# Altium PCB PCB1.PcbDoc (part 1 of 3)
Units mil, origin at the board's own origin, x right, y up, seen from the top; angles counter-clockwise.
Board outline 4825 x 2725 mil, 2 copper layers (Top Layer, Bottom Layer); 148 components, 112 nets, 484 pads, 116 vias.
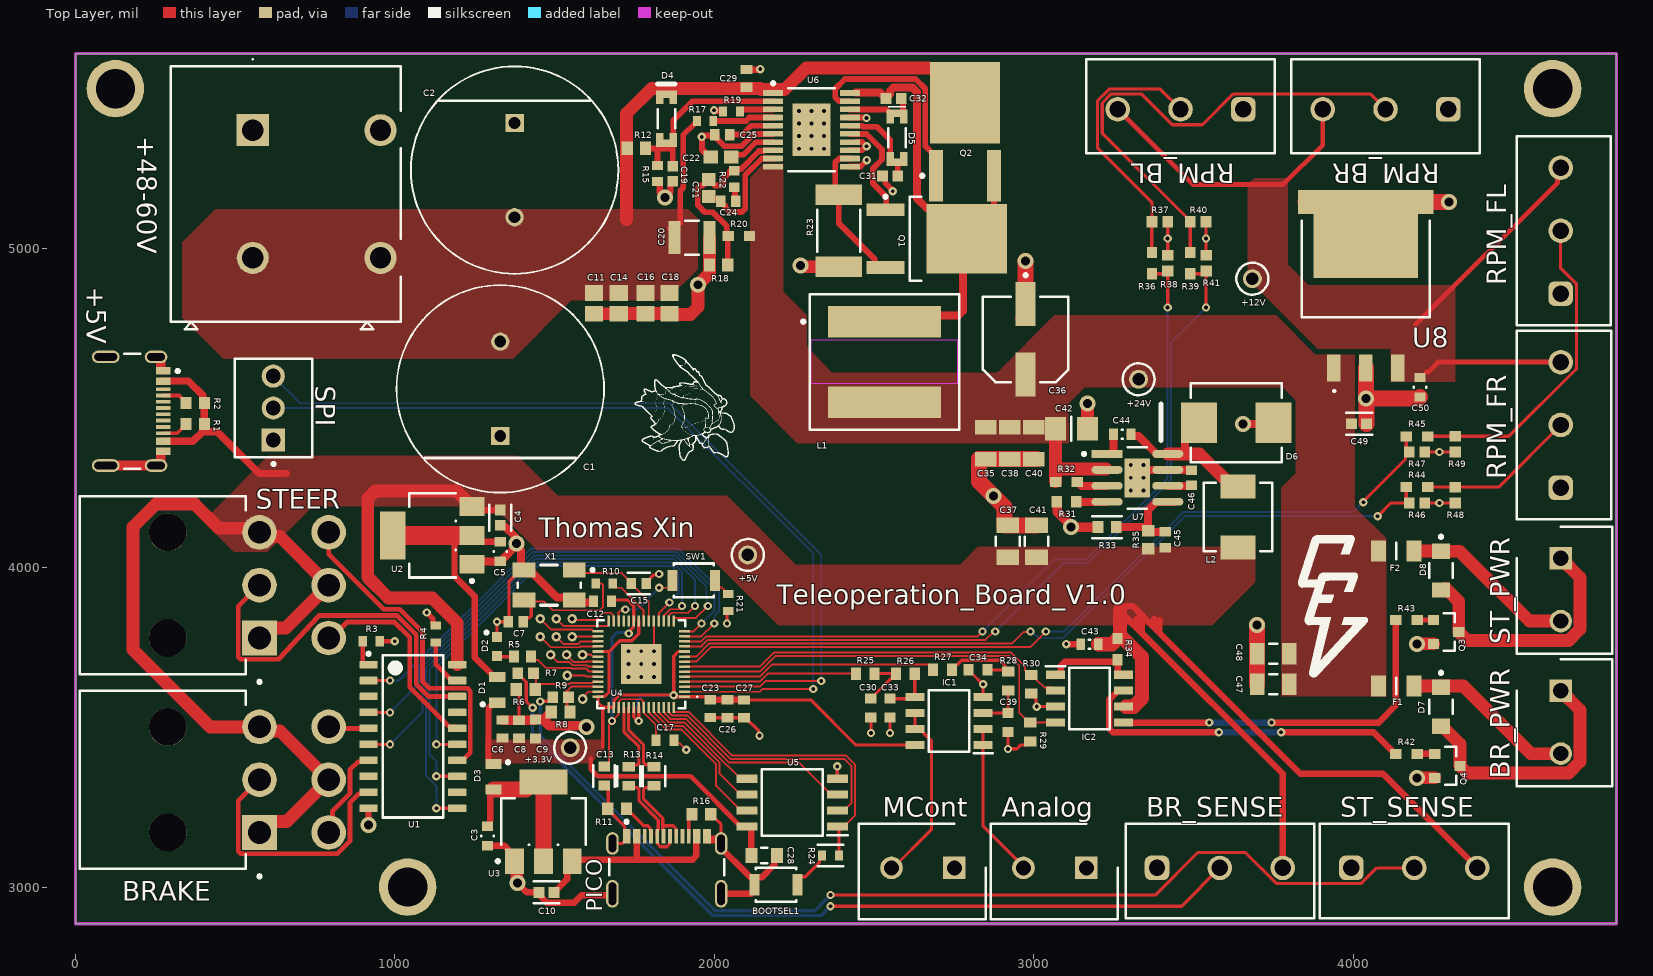
[diagram p0: Top Layer view]
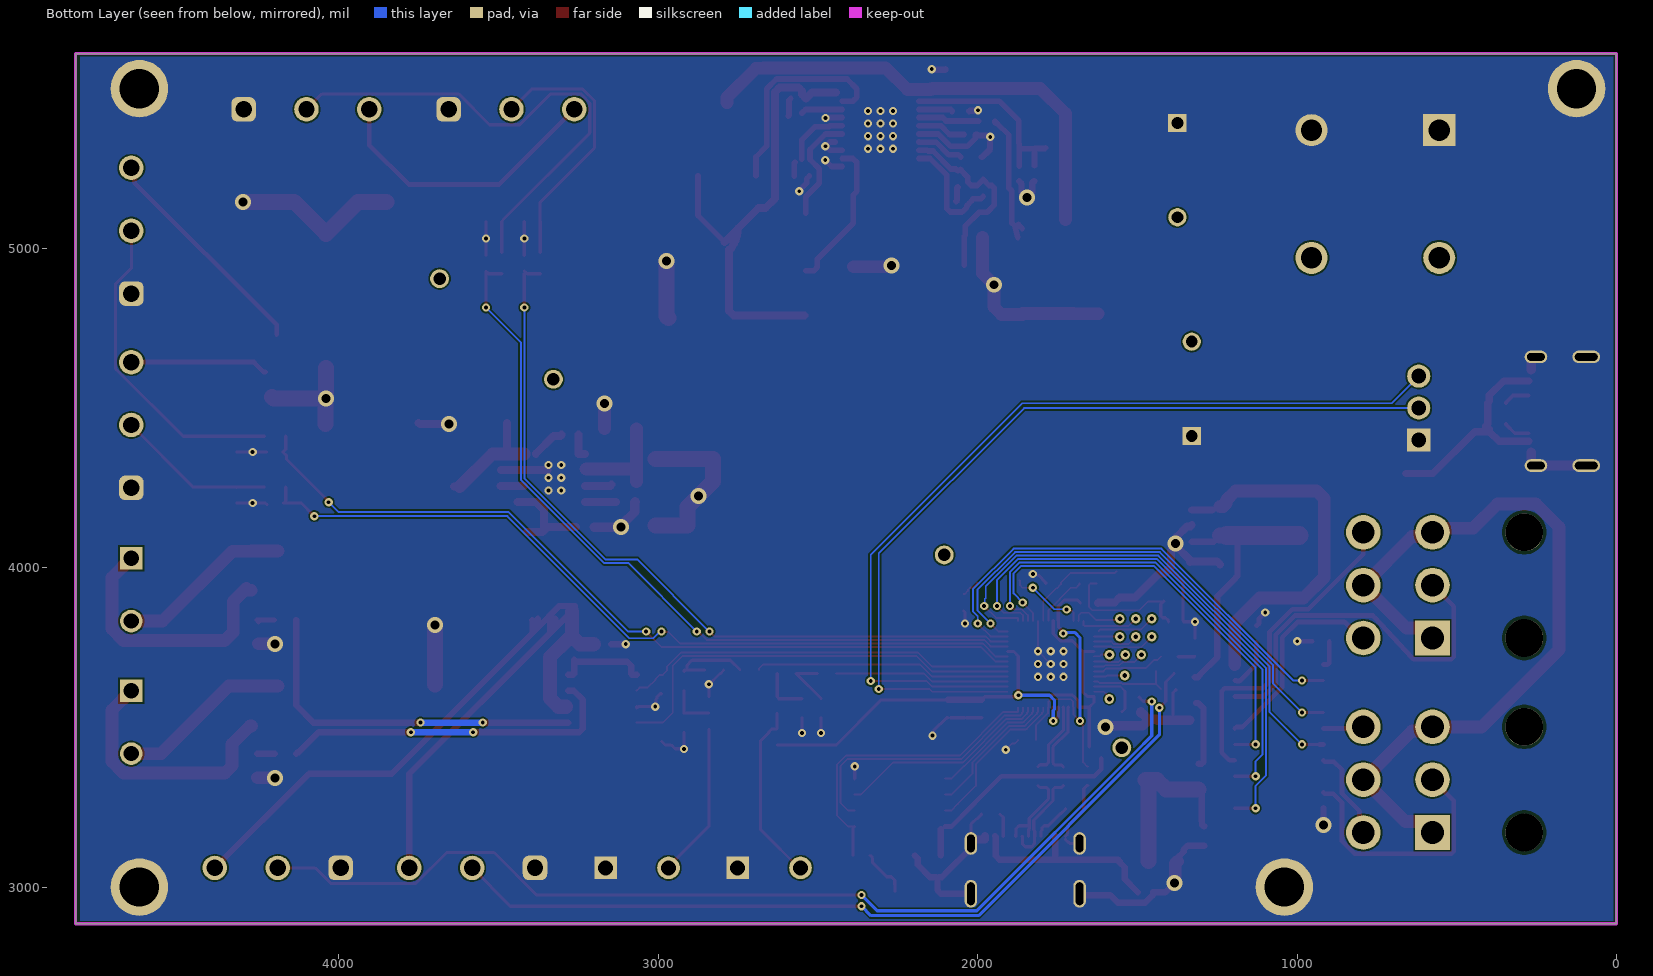
[diagram p1: Bottom Layer view, seen from below]
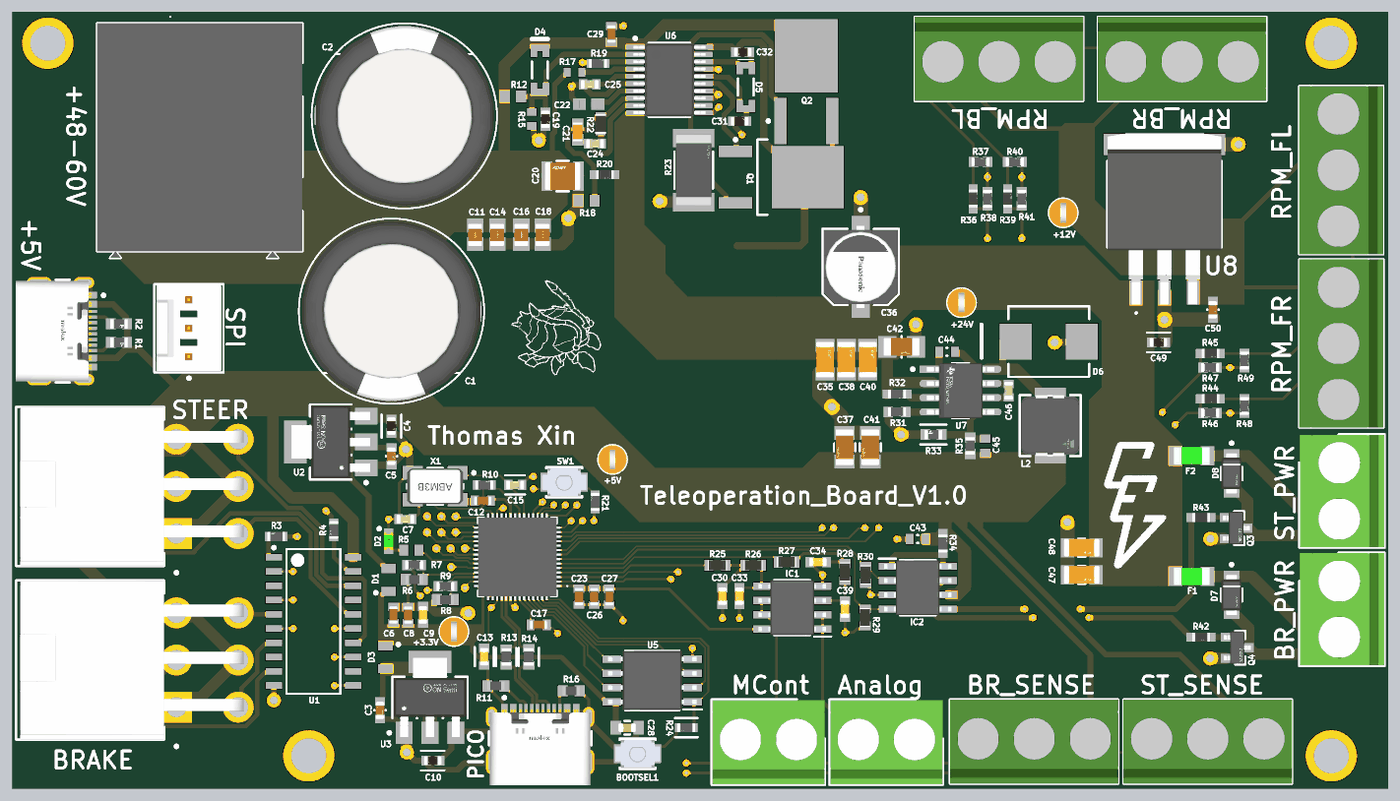
[diagram p3: 3D render of the assembled board from above, using the file's embedded part models]

## Layer stack, top to bottom
Top Solder: solder mask 0.4, Solder Resist, Dk 3.5
Top Layer: signal copper 1.4
Dielectric 1: dielectric 12.6, FR-4, Dk 4.8
Bottom Layer: signal copper 1.4
Bottom Solder: solder mask 0.4, Solder Resist, Dk 3.5

## Board outline
0,2885 4825,2885 4825,5610 0,5610

## Design rules (kind name [scope] priority, off if disabled: settings)
BoardOutlineClearance [All] p1: gap=7.87 ignorepadtopadclearanceinfootprint=FALSE
Clearance [All] p1: gap=5 ignorepadtopadclearanceinfootprint=FALSE except(4: Arc-Arc Arc-Track Track-Track; 9.84: Arc-Hole Track-Hole SMDPad-Hole THPad-Hole Via-Hole Fill-Hole Poly-Hole Region-Hole Text-Hole)
ComponentClearance [All] p1: gap=5 collisioncheckmode=3 verticalgap=5 showdistances=TRUE
DiffPairsRouting [All] p1: maxlimit=4 minlimit=4 mostfreqgap=4 toplayer_minwidth=7 toplayer_maxwidth=11 toplayer_prefwidth=11 bottomlayer_minwidth=7 bottomlayer_maxwidth=11 bottomlayer_prefwidth=11 maxuncoupledlength=500
Height [All] p1: minheight=0 maxheight=71497.94 prefheight=500
HoleSize [All] p1: absolutevalues=TRUE maxlimit=248.03 minlimit=11.81 maxpercent=80.000 minpercent=20.000
HoleToHoleClearance [All] p1: gap=9.84 allowstackedmicrovias=FALSE
MinimumAnnularRing [All] p1: minimumring=3
MinimumSolderMaskSliver [All] p1: minsoldermaskwidth=0
PlaneClearance [All] p1: clearance=5
PlaneConnect PlaneConnectPowerPads [InPadClass('PowerPads')] p1: planeconnectstyle=Direct reliefexpansion=20 reliefentries=4 reliefconductorwidth=10 reliefairgap=10
PlaneConnect [All] p2: planeconnectstyle=Direct reliefexpansion=11.81 reliefentries=4 reliefconductorwidth=5 reliefairgap=5
PolygonConnect PolygonConnectPowerPads [All vs (InPadClass('PowerPads'))] p1: connectstyle=Direct reliefconductorwidth=10 reliefentries=4 polygonreliefangle="90 Angle" airgapwidth=10
PolygonConnect [All] p2: connectstyle=Direct reliefconductorwidth=5 reliefentries=4 polygonreliefangle="90 Angle" airgapwidth=5
RoutingVias [All] p1: holewidth=11.81 width=23.62 viastyle="Through Hole" minholewidth=11.81 minwidth=23.62 maxholewidth=23.62 maxwidth=259.84
SilkToSilkClearance [All] p1: silktosilkclearance=0
SilkToSolderMaskClearance [IsPad] p1: minsilkscreentomaskgap=5 clearancetoexposedcopper=TRUE
SolderMaskExpansion [All] p1: expansion=2.95 istentingtop=FALSE
SupplyNets "Schematic Supply Nets_7" [InNet('+3V3')] p1: voltage=0.000
SupplyNets "Schematic Supply Nets_6" [InNet('+12')] p2: voltage=0.000
SupplyNets "Schematic Supply Nets_5" [InNet('+1V1')] p3: voltage=0.000
SupplyNets "Schematic Supply Nets_4" [InNet('+48')] p4: voltage=0.000
SupplyNets "Schematic Supply Nets_3" [InNet('GND')] p5: voltage=0.000
SupplyNets "Schematic Supply Nets_2" [InNet('+24')] p6: voltage=0.000
SupplyNets "Schematic Supply Nets_1" [InNet('VCC')] p7: voltage=0.000
SupplyNets "Schematic Supply Nets" [InNet('+5')] p8: voltage=0.000
Width [All] p1: maxlimit=1000 minlimit=5 preferedwidth=5 minimp=50.000000 maximp=50.000000 favimp=50.000000
20 further rules are at their usual default settings.

## Classes and differential pairs
component class "voltage dividers": R3 R25 R38 R39 R41 R43 R44 R46 R48
component class U_Sheet1: bootsel BOOTSEL1 C3 C7 C8 C10 C11 C13 C16 C26 C29 C35 C37 C40 C41 D2 D6 PICO R10 R11 R13 R19 R20 R21 R25 SW1 U3 U4 X1
component class Teleoperation_Board_V1.0: +5V +48-60V Analog BR_PWR BR_SENSE BRAKE C2 MCont R1 R2 R26 R31 R48 R49 RPM_BL rpm_br RPM_FL RPM_FR spI ST_PWR ST_SENSE STEER
component class "steppers and drivetrain": C8 C13 C26 C30 IC2 R3 R13 R25 R26 R28 R46 U1
component class power: +3.3v +5V +12V +24V C7 C8 C11 C14 C16 C18 C19 C25 C26 C29 C30 C31 C32 C35 C37 C40 C41 C42 C45 C46 C50 D1 D2 D6 L2 Q1 R1 R12 R18 R19 R20 R31 R32 R35 R39 U1 U2 U6 U8
component class Designator: C46 D7 D8 F1 IC2 Q3 Q4 R10 R11 R30 R34 R43
differential pair NewDifferentialPair1: +USB_P -USB_N
differential pair PICO_USB: +NetR26_1 -NetR27_1

## Components (designator, comment, footprint, x,y, rotation, side; value= is the part's Value field where it differs from the comment)
+3.3V "5003" KSTN-5003 1548.76,3436.29 r90 top (schematic designator TP_4)
+5V "5003" KSTN-5003 2105,4040 r90 top (schematic designator TP_2)
+5V "217179-0001" FP-2171790001-MFG 140,4490 r270 top (schematic designator J7)
+12V "5003" KSTN-5003 3685,4905 r90 top (schematic designator TP_3)
+24V "5003" KSTN-5003 3328.55,4590 r90 top (schematic designator TP_1)
+48-60V "VP0265540000G" VP0265540000G 555,5370 r270 top (schematic designator P1)
Analog "691137710002" SHDR2W70P0X500_1X2_1000X750X1150P 3165,3060 r180 top (schematic designator J15)
BOOTSEL1 "B3U-1000P" FP-B3U-1000P-MFG 2193.03,3007.43 r0 top (schematic designator SW1)
BR_PWR "691137710002" SHDR2W70P0X500_1X2_1000X750X1150P 4650.41,3614.59 r270 top (schematic designator J14)
BR_SENSE "691137710003" 691137710003 3583.15,3050.16 r0 top (schematic designator J1)
BRAKE "39-30-0060" FP-39-30-0060-MFG 280.82,3336.24 r270 top (schematic designator J10)
C1 "ESH477M100AM2AA" FP-ESH477M100AM2AA-MFG 1330,4560 r90 top (schematic designator C2)
C2 "ESH477M100AM2AA" FP-ESH477M100AM2AA-MFG 1375,5245 r270 top (schematic designator C1)
C3 "GRT188R61E106ME13D" FP-GRT188-0_2-MFG 1290,3160 r270 top (schematic designator C30)
C4 "UMK107AB7105KA-T" FP-0603-L_1_6_0_15-W_0_8-IPC_C 1329.92,4156.76 r270 top (schematic designator C27)
C5 "GRT188R61E106ME13D" FP-GRT188-0_2-MFG 1330,4051.08 r270 top (schematic designator C26)
C6 "CL10B104KC8NNNC" CAPC1608X90N 1336.91,3494.68 r90 top value=100nF (schematic designator C37)
C7 "C0603C270J5GACTU" FP-C0603C-CF-MFG 1378.87,3830.55 r0 top value="27 pF" (schematic designator C49)
C8 "CL10B104KC8NNNC" CAPC1608X90N 1388.49,3494.19 r90 top value=100nF (schematic designator C36)
C9 "CC0603KPX7R7BB105" FP-CC0603-DA-MFG 1440.54,3494.71 r90 top value="1 uF" (schematic designator C35)
C10 "UMK107AB7105KA-T" FP-0603-L_1_6_0_15-W_0_8-IPC_C 1474.79,2983.48 r180 top (schematic designator C31)
C11 "2.2uF" FP-GRM21B-0_2-e0_2_0_7-IPC_B 1623.22,4827.81 r270 top (schematic designator C4)
C12 "CL10B104KC8NNNC" CAPC1608X90N 1650,3895 r180 top value=100nF (schematic designator C33)
C13 "CC0603KPX7R7BB105" FP-CC0603-DA-MFG 1655.27,3348.01 r270 top value="1 uF" (schematic designator C34)
C14 "2.2uF" FP-GRM21B-0_2-e0_2_0_7-IPC_B 1700.88,4827.81 r270 top (schematic designator C5)
C15 "C0603C270J5GACTU" FP-C0603C-CF-MFG 1763.51,3950.44 r180 top value="27 pF" (schematic designator C48)
C16 "2.2uF" FP-GRM21B-0_2-e0_2_0_7-IPC_B 1785,4827.81 r270 top (schematic designator C6)
C17 "CL10B104KC8NNNC" CAPC1608X90N 1845.8,3460 r0 top value=100nF (schematic designator C32)
C18 "2.2uF" FP-GRM21B-0_2-e0_2_0_7-IPC_B 1860,4827.81 r270 top (schematic designator C7)
C19 "UMK107AB7105KA-T" FP-0603-L_1_6_0_15-W_0_8-IPC_C 1869.86,5233.53 r270 top
C20 "C1210C105K1RACTU" FP-C1210C105K1RACTU-MFG 1930.1,5033.77 r0 top (schematic designator C8)
C21 "CC0603JRNPO9BN101" CAPC1608X90X40ML10T20 1982.8,5188.62 r270 top (schematic designator C20)
C22 "CL10B104KC8NNNC" FP-CL10-IPC_A 2020.97,5285.81 r0 top (schematic designator C10)
C23 "CL10B104KC8NNNC" CAPC1608X90N 1987.45,3558.42 r270 top value=100nF (schematic designator C40)
C24 "C0603C332J5RACTU" FP-C0603C-CF-MFG 2043.52,5147.74 r0 top value="3,300 pF" (schematic designator C18)
C25 "1000 pF" FP-C0603C-CF-MFG 2025.02,5355.65 r0 top value="1,000 pF" (schematic designator C11)
C26 "CL10B104KC8NNNC" CAPC1608X90N 2041.01,3558.35 r270 top value=100nF (schematic designator C39)
C27 "CL10B104KC8NNNC" CAPC1608X90N 2093.51,3558.23 r270 top value=100nF (schematic designator C38)
C28 "CL10B104KC8NNNC" FP-CGA3E-0_3-0_1-IPC_A 2156.55,3098.79 r0 top (schematic designator C41)
C29 "CL10B104KC8NNNC" CAPC1608X90N 2100.99,5532.19 r90 top value=100nF (schematic designator C9)
C30 "22nF" FP-CC0603-DA-MFG 2490.47,3560.39 r270 top value="22 nF" (schematic designator C44)
C31 "UMK107AB7105KA-T" FP-0603-L_1_6_0_15-W_0_8-IPC_C 2550.93,5226.23 r0 top (schematic designator C21)
C32 "UMK107AB7105KA-T" FP-0603-L_1_6_0_15-W_0_8-IPC_C 2561.52,5468.99 r180 top (schematic designator C3)
C33 "22nF" FP-CC0603-DA-MFG 2550,3560.39 r270 top value="22 nF" (schematic designator C45)
C34 "22nF" FP-CC0603-DA-MFG 2825.47,3680 r180 top value="22 nF" (schematic designator C46)
C35 "885012108022" FP-CL31-IPC_C 2850,4390 r270 top value=10uF (schematic designator C17)
C36 "50SVPK10M" FP-OS-CON-SMT-C6-MFG 2975,4715 r270 top (schematic designator C12)
C37 "47uF" FP-GRM31C-0_3-e0_3_0_8-IPC_C 2918.85,4082.59 r270 top (schematic designator C28)
C38 "885012108022" FP-CL31-IPC_C 2925,4390 r270 top value=10uF (schematic designator C16)
C39 "22nF" FP-CC0603-DA-MFG 2920,3515 r270 top value="22 nF" (schematic designator C47)
C40 "885012108022" FP-CL31-IPC_C 3000,4390 r270 top value=10uF (schematic designator C15)
C41 "47uF" FP-GRM31C-0_3-e0_3_0_8-IPC_C 3008.85,4082.59 r270 top (schematic designator C23)
C42 "4.7uF" FP-GRJ31C-0_3-IPC_B 3118.42,4435.14 r0 top
C43 "CAP 100nF 10V 0603(1608)" CAPC0603(1608)100_L 3175,3760.75 r0 top value=100nF (schematic designator C50)
C44 "100nF" CAPC0603(1608)100_L 3277.27,4417.42 r0 top (schematic designator C22)
C45 "220pF" CAPC1608X92X38LL15T08 3412.06,4087.69 r270 top (schematic designator C29)
C46 "15nF" FP-C0603C-CF-MFG 3494.03,4281.34 r90 top value="15,000 pF" (schematic designator C43)
C47 "885012108022" FP-CL31-IPC_C 3750,3635 r180 top value=10uF (schematic designator C14)
C48 "885012108022" FP-CL31-IPC_C 3750,3730 r180 top value=10uF (schematic designator C13)
C49 "UMK107AB7105KA-T" FP-0603-L_1_6_0_15-W_0_8-IPC_C 4018.94,4450.59 r0 top (schematic designator C25)
C50 "GRT188R61E106ME13D" FP-GRT188-0_2-MFG 4210,4565 r270 top (schematic designator C24)
D1 "BAT42WS RRG" "BAT42WS RRG-Footprint-1" 1320,3617.12 r90 top (schematic designator D5)
D2 "LTST-C190GKT" FP-LTST-C190GKT-MFG 1320,3752.83 r270 top (schematic designator D4)
D3 "BAT42WS RRG" "BAT42WS RRG-Footprint-1" 1308.85,3345.85 r270 top (schematic designator D7)
D4 "LL4148" FAIR-SOD80-2_V 1850.24,5406.22 r90 top (schematic designator D2)
D5 "LL4148" FAIR-SOD80-2_V 2572.01,5346.33 r90 top (schematic designator D1)
D6 "700mV" DIOD-B5X0C-2_M 3634.42,4453.59 r0 top (schematic designator D3)
D7 "NRVBSS34FA" FP-425AB-MFG 4275.41,3564.59 r270 top (schematic designator D12)
D8 "NRVBSS34FA" FP-425AB-MFG 4275.41,3990.61 r270 top (schematic designator D11)
F1 "046802.5NR" FUSC3215X76N 4135.41,3629.59 r0 top (schematic designator F2)
F2 "046802.5NR" FUSC3215X76N 4135.41,4052.54 r0 top (schematic designator F1)
IC1 "TLV9002IDR" SOIC127P600X175-8N 2735,3520 r180 top (schematic designator IC2)
IC2 "UCC27624DR" SOIC127P600X175-8N 3175,3590 r0 top (schematic designator IC1)
L1 "78439369150" WE-XHMA_1090 52532.7,54644.29 r0 top
L2 "4.7 uH" FP-IHLP-2020CZ-FP_1_905x2-MFG 3639.42,4158.59 r270 top
MCont "691137710002" SHDR2W70P0X500_1X2_1000X750X1150P 2751.85,3060 r180 top (schematic designator J12)
PICO "217179-0001" FP-2171790001-MFG 1851.33,3024.35 r0 top (schematic designator J11)
Q1 "DMT10H009LK3-13" DPAK229P991X239-3N 2697.48,5030 r0 top (schematic designator Q2)
Q2 "RD3P100SNTL1" DPAK230P990X240-3N 2785,5365 r90 top (schematic designator Q1)
Q3 "DMN6140L-13" FP-SOT23-MFG 4291.57,3798.96 r0 top
Q4 "DMN6140L-13" FP-SOT23-MFG 4295.41,3379.59 r0 top
R1 "10kOhm" FP-MCT0603-IPC_B 374.89,4450.47 r0 top (schematic designator R22)
R2 "10kOhm" FP-MCT0603-IPC_B 374.89,4515.43 r0 top (schematic designator R21)
R3 "AA0603JR-070RL" FP-AF0603-IPC_C 926.11,3769.55 r180 top (schematic designator R47)
R4 "AA0603JR-070RL" FP-AF0603-IPC_C 1127.86,3792.43 r270 top (schematic designator R44)
R5 "ERJ-3EKF1150V" RESC1608X55X30NL15T15 1399.76,3721.48 r180 top (schematic designator R28)
R6 "MCT06030D5001BP500" RESC1608X55N 1409.69,3618.72 r180 top (schematic designator R35)
R7 "ERA3AEB202V" FP-ERA3A-IPC_C 1409.69,3669.63 r180 top (schematic designator R33)
R8 "MCT06030D5001BP500" RESC1608X55N 1518.96,3548.14 r180 top (schematic designator R34)
R9 "ERA3AEB202V" FP-ERA3A-IPC_C 1518.96,3594.88 r180 top (schematic designator R32)
R10 "RC0603FR-071KL" FP-RC0603-0_55-IPC_C 1655.16,3950.22 r0 top (schematic designator R42)
R11 "ERJ-3EKF5101V" RESC1608X55N 1695.82,3245.46 r180 top value=5.1k (schematic designator R24)
R12 "ERJ-3EKF6192V" RESC1608X55X30ML15T15 1755.91,5313.14 r180 top (schematic designator R15)
R13 "CRCW060327R4FKEA" FP-CRCW0603-e3-MFG 1732.12,3346.89 r270 top (schematic designator R27)
R14 "CRCW060327R4FKEA" FP-CRCW0603-e3-MFG 1811.25,3347.39 r270 top (schematic designator R26)
R15 "ERJ-3EKF3921V" RESC1608X55X30LL15T15#1 1822.26,5234.28 r90 top (schematic designator R17)
R16 "ERJ-3EKF5101V" RESC1608X55N 1959.79,3228.23 r0 top value=5.1k (schematic designator R25)
R17 "RC0603FR-071ML" RESC1608X55X25LL10T15 1971.61,5397.98 r0 top (schematic designator R13)
R18 "ERJ-3EKF1431V" RESC1608X55X30ML15T15 2013.7,4948.03 r0 top
R19 "RC0603FR-0712K4L" FP-RC0603-0_55-IPC_C 2053.78,5428.69 r0 top value=12.4kΩ (schematic designator R14)
R20 "RT0603BRE0726K7L" FP-RT0603-MFG 2077.06,5038.85 r0 top value=26.7KΩ (schematic designator R16)
R21 "RC0603FR-071KL" FP-RC0603-0_55-IPC_C 2044,3890.75 r90 top (schematic designator R30)
R22 "ERJ3EKF1802V" RESC1608X55X30LL15T15#2 2062.75,5217.36 r270 top (schematic designator R20)
R23 "PA2512FKE7W0R007E" FP-PA2512E-R007-0R10-MFG 2389.69,5055 r90 top value=7mΩ (schematic designator R19)
R24 "RC0603FR-071KL" FP-RC0603-0_55-IPC_C 2363.7,3099.18 r180 top (schematic designator R29)
R25 "Resistor 10k +/-1% 0603 100 mW" RESC1608X55X25ML10T15 2472.76,3668.5 r0 top value=10k (schematic designator R36)
R26 "Resistor 10k +/-1% 0603 100 mW" RESC1608X55X25ML10T15 2598.21,3668.5 r0 top value=10k (schematic designator R37)
R27 "Resistor 10k +/-1% 0603 100 mW" RESC1608X55X25ML10T15 2715,3680 r0 top value=10k (schematic designator R38)
R28 "Resistor 10k +/-1% 0603 100 mW" RESC1608X55X25ML10T15 2920,3645 r270 top value=10k (schematic designator R39)
R29 "Resistor 10k +/-1% 0603 100 mW" RESC1608X55X25ML10T15 2990,3485.47 r90 top value=10kohm (schematic designator R43)
R30 "Resistor 10k +/-1% 0603 100 mW" RESC1608X55X25ML10T15 2991.97,3635 r90 top value=10kohm (schematic designator R46)
R31 "26.7 kOhm" FP-AC0603-IPC_B 3102.67,4206.34 r0 top (schematic designator R40)
R32 "100 kOhm" FP-AC0603-MFG 3102.67,4268.59 r0 top (schematic designator R23)
R33 "10kOhm" FP-MCT0603-IPC_B 3229.87,4127.06 r180 top (schematic designator R41)
R34 "100 kOhm" FP-AC0603-MFG 3263.27,3745 r90 top (schematic designator R48)
R35 "68.1kOhm" FP-CRCW0603-e3-IPC_B 3358.73,4087.65 r90 top (schematic designator R31)
R36 "RT0603BRD075K23L" FP-RT0603-MFG 3370,4953.66 r90 top value=5.23KΩ (schematic designator R5)
R37 "ERA-3AEB103V" FP-ERA3A-IPC_C 3395,5083.66 r0 top (schematic designator R11)
R38 "ERA3AEB202V" FP-ERA3A-IPC_C 3419.63,4953.66 r270 top (schematic designator R6)
R39 "RT0603BRD075K23L" FP-RT0603-MFG 3490.37,4953.66 r90 top value=5.23KΩ (schematic designator R7)
R40 "ERA-3AEB103V" FP-ERA3A-IPC_C 3515.37,5083.66 r0 top (schematic designator R12)
R41 "ERA3AEB202V" FP-ERA3A-IPC_C 3540,4953.66 r270 top (schematic designator R8)
R42 "47ohm" FP-RT0603-MFG 4167.5,3416.99 r0 top value=47Ω (schematic designator R49)
R43 "47ohm" FP-RT0603-MFG 4167.5,3836.36 r0 top value=47Ω (schematic designator R45)
R44 "RT0603BRD075K23L" FP-RT0603-MFG 4200.37,4252.53 r0 top value=5.23KΩ (schematic designator R2)
R45 "RT0603BRD075K23L" FP-RT0603-MFG 4200.37,4411.49 r0 top value=5.23KΩ (schematic designator R1)
R46 "ERA3AEB202V" FP-ERA3A-IPC_C 4200.37,4202.53 r180 top (schematic designator R4)
R47 "ERA3AEB202V" FP-ERA3A-IPC_C 4200.37,4362.22 r180 top (schematic designator R3)
R48 "ERA-3AEB103V" FP-ERA3A-IPC_C 4320.37,4227.16 r270 top (schematic designator R9)
R49 "ERA-3AEB103V" FP-ERA3A-IPC_C 4320.37,4386.86 r270 top (schematic designator R10)
RPM_BL "691137710003" 691137710003 3460,5444.84 r180 top (schematic designator J5)
RPM_BR "691137710003" 691137710003 4101.85,5444.84 r180 top (schematic designator J6)
RPM_FL "691137710003" 691137710003 4659.84,5055 r90 top (schematic designator J4)
RPM_FR "691137710003" 691137710003 4660.25,4446.85 r90 top (schematic designator J3)
SPI "22-29-2031" FP-22-29-2031-MFG 620,4500 r90 top (schematic designator J8)
ST_PWR "691137710002" SHDR2W70P0X500_1X2_1000X750X1150P 4650.41,4029.59 r270 top (schematic designator J13)
ST_SENSE "691137710003" 691137710003 4191.85,3050.16 r0 top (schematic designator J2)
STEER "39-30-0060" FP-39-30-0060-MFG 280.82,3945.25 r270 top (schematic designator J9)
SW1 "B3U-1000P" FP-B3U-1000P-MFG 1935.61,3960 r0 top (schematic designator SW2)
U1 "SN74AHCT244NSR" NS0020A_L 1056.35,3471.81 r0 top (schematic designator U7)
U2 "TLV76136DCYR" TLV76136DCYR-Footprint-1 1117.16,4101.19 r180 top (schematic designator U3)
U3 "TLV76136DCYR" TLV76136DCYR-Footprint-1 1465,3205 r90 top (schematic designator U4)
U4 "RP2040" RP2040TR7 1771.39,3698.25 r180 top (schematic designator U5)
U5 "AT25QF128A-SHB-T" SOIC127P790X216-8N 2244.5,3264.4 r180 top (schematic designator U6)
U6 "LM5116MHX/NOPB" PWP0020A_M 2304.54,5371.01 r0 top (schematic designator U1)
U7 "LMR16030SDDAR" FP-DDA0008E-IPC_A 3324.99,4281.34 r0 top (schematic designator U8)
U8 "LM7812S_NOPB" KTT0003B 4040,5123.82 r270 top (schematic designator U2)
X1 "ABM3B-12.000MHZ-B2-T" ABRA-ABM3B-4_V 1483.04,3945.69 r180 top

## Footprints (in the part's own frame and the unit in brackets; to place one, negate y for a bottom-side part, rotate by r counter-clockwise, add the part's x,y. Pads: shape width x height; smd on the part's side, far side on the other; paste and mask are expansions set on the pad)
691137710003 [mm] "Horizontal Cable Entry with Pressure Clamp, pitch 5mm, 03p"
  rrect50% 1.95x1.95 hole 1.3: 1(-5,0.25)
  round 1.95 hole 1.3: 2(0,0.25) 3(5,0.25)
  silkscreen extent -7.5,-3.75 7.5,3.75, body extent -7.5,-3.75 7.5,3.75, height 11.6
ABRA-ABM3B-4_V [mm] "SMD, 4-Leads, Body 5x3.2mm"
  rect 1.8x1.2 smd: 1(-2,-1.2) 2(2,-1.2) 3(2,1.2) 4(-2,1.2)
  silkscreen extent -3.58,-1.6 2.5,1.6, body extent -2.5,-1.59 2.5,1.59, height 1.13
"BAT42WS RRG-Footprint-1" [mm]
  rect 0.8x1.3 smd: 1(-1.016,0) 2(1.016,0)
  silkscreen extent -1.27,1.02 -1.02,1.27, body extent -0.85,-0.63 0.85,0.63, height 1.06
CAPC0603(1608)100_L [mm] "Chip Capacitor, Body 1.6x0.8mm, Height 1.0mm, IPC High Density"
  rect 0.7x0.9 smd: 1(-0.7,0) 2(0.7,0)
  silkscreen extent -0.05,-0.35 0.05,0.35, body extent -0.87,-0.47 0.88,0.48, height 1
CAPC1608X90N [mm]
  rect 0.73x0.94 smd: 1(-0.71,0) 2(0.71,0)
  body extent -0.8,-0.4 0.8,0.4, height 0.9
CAPC1608X90X40ML10T20 [mm] "Chip Capacitor, 2-Leads, Body 1.7x0.9mm, IPC Low Density"
  rect 1.05x1.05 smd: 1(-0.675,0) 2(0.675,0)
  body extent -0.85,-0.45 0.85,0.45, height 0.9
CAPC1608X92X38LL15T08 [mm] "Chip Capacitor, 2-Leads, Body 1.60x0.80mm, IPC High Density"
  rect 0.75x0.9 smd: 1(-0.625,0) 2(0.625,0)
  body extent -0.87,-0.48 0.87,0.48, height 0.92
DIOD-B5X0C-2_M [mm] "Molded Diode, 2-Leads, Body 7.11x6.22mm, IPC Low Density"
  rect 2.85x3.2 smd: 1(-2.95,0) 2(2.95,0)
  silkscreen extent -3.6,-3.15 3.6,3.15, body extent -3.56,-3.11 3.55,3.11, height 2.63
DPAK229P991X239-3N [mm] "D-PAK, 3-Pads, Body 6.20x6.71mm (max), IPC Medium Density"
  rect 3x1 smd: 1(-4.1,2.29) 3(-4.1,-2.29)
  rect 6.4x5.55 smd: 2(2.35,0)
  silkscreen extent -4.22,-3.35 -1.25,3.46, body extent -2.15,-3.35 4.05,3.35, height 2.39
DPAK230P990X240-3N [mm] "D-PAK, 3-Pads, Body 6.30x6.76mm (max), IPC Medium Density"
  rect 4.1x1.1 smd: 1(-3.5,2.3) 3(-3.5,-2.3)
  rect 6.5x5.6 smd: 2(2.3,0)
  silkscreen extent -3.62,3.27 -3.38,3.52, body extent -2.15,-3.4 4.25,3.4, height 2.4
FAIR-SOD80-2_V [mm] "SOD, 2-Leads, Body 3.45x1.4mm"
  rect 0.6x1.65 smd: 1(-1.95,0) 2(1.95,0)
  rect 1.1x0.575 smd: ""(-1.7,-0.537) ""(-1.7,0.537) ""(1.7,-0.537) ""(1.7,0.537)
  silkscreen extent -0.75,-0.7 2.75,0.7, body extent -1.73,-0.7 1.73,0.7, height 2.1
FP-22-29-2031-MFG [mm]
  rect 1.84x1.84 hole 1.19 paste-2539.97 mask+0: 1(-2.54,0.02)
  round 1.84 hole 1.19 paste-2539.97 mask+0: 2(0,0.02) 3(2.54,0.02)
  silkscreen extent -4.57,-3.08 3.94,3.08, body extent -4.04,-3.18 4.04,3.17, height 0.25
FP-39-30-0060-MFG [mm]
  rect 2.75x2.75 hole 1.8 paste-2539.97 mask+0: 1(4.2,7.5)
  round 2.75 hole 1.8 paste-2539.97 mask+0: 2(0,7.5) 3(-4.2,7.5) 4(4.2,13) 5(0,13) 6(-4.2,13)
  round 3 hole 3 unplated paste-2539.97 mask+0: ""(-4.2,0.2) ""(4.2,0.2)
  silkscreen extent -7.09,-6.78 7.81,7.63, body extent -7.19,-6.88 7.19,14.48, height 0.25
FP-425AB-MFG [mm]
  rect 1.2x1.4 smd paste+0 mask+0: 1(-1.55,0) 2(1.55,0)
  silkscreen extent -2.82,-0.95 0.58,0.95, body extent -2.25,-1.05 2.25,1.05, height 0.25
FP-0603-L_1_6_0_15-W_0_8-IPC_C [mil]
  rect 33.77x33.94 smd paste+0 mask+0: 1(-23.71,0) 2(23.71,0)
  silkscreen extent -41,-34 41,34, body extent -45,-23 45,23, height 10
FP-2171790001-MFG [mm]
  rrect100% 1x1.8 hole 1.4 slot 0.6 at 0 deg paste-2539.97 mask+0: 1(-4.32,2.85) 2(4.32,2.85)
  rrect100% 1x2.2 hole 1.8 slot 0.6 at 0 deg paste-2539.97 mask+0: 3(-4.32,-1.15) 4(4.32,-1.15)
  rect 0.6x1.15 smd paste+0 mask+0: A1-B12(-3.2,3.425) A4-B9(-2.4,3.425) B1-A12(3.2,3.425) B4-A9(2.4,3.425)
  rect 0.3x1.15 smd paste+0 mask+0: A5(-1.25,3.425) A6(-0.25,3.425) A7(0.25,3.425) A8(1.25,3.425) B5(1.75,3.425) B6(0.75,3.425) B7(-0.75,3.425) B8(-1.75,3.425)
  silkscreen extent -4.57,0.33 4.57,4.7, body extent -4.92,-3.45 4.92,4.1, height 0.25
FP-AC0603-IPC_B [mil]
  rect 33.81x35.91 smd paste+0 mask+0: 1(-30.58,0) 2(30.58,0)
  body extent -57,-28 57,28, height 10
FP-AC0603-MFG [mm]
  rect 0.9x0.8 smd paste+0 mask+0: 1(-0.85,0) 2(0.85,0)
  body extent -1.4,-0.55 1.4,0.55, height 0.25
FP-AF0603-IPC_C [mil]
  rect 25.93x31.97 smd paste+0 mask+0: 1(-26.64,0) 2(26.64,0)
  body extent -44,-22 44,22, height 10
FP-B3U-1000P-MFG [mm]
  rect 0.8x1.7 smd paste+0 mask+0: 1(-1.7,0) 2(1.7,0)
  silkscreen extent -1.6,-1.35 1.6,1.35, body extent -2.2,-1.45 2.2,1.45, height 0.25
FP-C0603C-CF-MFG [mm]
  rect 0.75x0.9 smd paste+0 mask+0: 1(-0.6,0) 2(0.6,0)
  body extent -1.2,-0.6 1.2,0.6, height 0.25
FP-C1210C105K1RACTU-MFG [mm]
  rect 0.95x2.6 smd paste+0 mask+0: 1(-1.4,0) 2(1.4,0)
  silkscreen extent -0.55,-1.35 0.55,1.35, body extent -2,-1.45 2,1.45, height 0.25
FP-CC0603-DA-MFG [mm]
  rect 0.8x0.9 smd paste+0 mask+0: 1(-0.75,0) 2(0.75,0)
  body extent -1.35,-0.75 1.35,0.75, height 0.25
FP-CGA3E-0_3-0_1-IPC_A [mm]
  rect 0.956x1.206 smd paste+0 mask+0: 1(-1.025,0) 2(1.025,0)
  silkscreen extent -0.25,-0.6 0.25,0.6, body extent -2,-1.1 2,1.1, height 0.25
FP-CL10-IPC_A [mil]
  rect 45.6x39.85 smd paste+0 mask+0: 1(-32.56,0) 2(32.56,0)
  body extent -75,-40 75,40, height 10
FP-CL31-IPC_C [mil]
  rect 45.45x67.17 smd paste+0 mask+0: 1(-50.23,0) 2(50.23,0)
  body extent -77,-39 77,39, height 10
FP-CRCW0603-e3-IPC_B [mil]
  rect 36.81x37.88 smd paste+0 mask+0: 1(-28.17,0) 2(28.17,0)
  body extent -56,-29 56,29, height 10
FP-CRCW0603-e3-MFG [mm]
  rect 0.75x1 smd paste+0 mask+0: 1(-0.75,0) 2(0.75,0)
  silkscreen extent -0.8,-0.9 0.8,0.9, body extent -1.22,-0.6 1.22,0.6, height 0.25
FP-DDA0008E-IPC_A [mm]
  rect 2.474x0.622 smd paste+0 mask+0: 1(-2.416,1.905)
  rrect100% 2.474x0.622 smd paste+0 mask+0: 2(-2.416,0.635) 3(-2.416,-0.635) 4(-2.416,-1.905) 5(2.416,-1.905) 6(2.416,-0.635) 7(2.416,0.635) 8(2.416,1.905)
  rect 2.025x3.1 smd paste-1000 mask+0: 9(0,0)
  silkscreen extent -4.37,-2.45 0.75,2.45, body extent -4.15,-2.95 4.15,2.95, height 0.25
FP-ERA3A-IPC_C [mil]
  rect 33.66x35.68 smd paste+0 mask+0: 1(-24.63,0) 2(24.63,0)
  body extent -45,-24 45,24, height 10
FP-ESH477M100AM2AA-MFG [mm]
  rect 1.45x1.45 hole 0.95 paste-2539.97 mask+0: 1(-3.75,0)
  round 1.45 hole 0.95 paste-2539.97 mask+0: 2(3.75,0)
  silkscreen extent -8.25,-8.25 8.25,8.25, body extent -8.35,-8.35 8.35,8.35, height 0.25
FP-GRJ31C-0_3-IPC_B [mil]
  rect 65.08x74.97 smd paste+0 mask+0: 1(-50.22,0) 2(50.22,0)
  silkscreen extent 0,-37 0,37, body extent -93,-47 93,47, height 10
FP-GRM21B-0_2-e0_2_0_7-IPC_B [mil]
  rect 49.4x57.33 smd paste+0 mask+0: 1(-32.51,0) 2(32.51,0)
  body extent -67,-39 67,39, height 10
FP-GRM31C-0_3-e0_3_0_8-IPC_C [mil]
  rect 49.35x71.03 smd paste+0 mask+0: 1(-50.21,0) 2(50.21,0)
  silkscreen extent -14,-37 14,37, body extent -79,-41 79,41, height 10
FP-GRT188-0_2-MFG [mm]
  rect 0.75x0.9 smd paste+0 mask+0: 1(-0.775,0) 2(0.775,0)
  silkscreen extent -0.03,-0.5 0.03,0.5, body extent -1.25,-0.6 1.25,0.6, height 0.25
FP-IHLP-2020CZ-FP_1_905x2-MFG [mm]
  rect 1.905x2.79 smd paste+0 mask+0: 1(-2.425,0) 2(2.425,0)
  silkscreen extent -2.72,-2.72 2.72,2.72, body extent -3.48,-2.82 3.48,2.82, height 0.25
FP-LTST-C190GKT-MFG [mm]
  rect 0.8x0.8 smd paste+0 mask+0: 1(-0.75,0) 2(0.75,0)
  silkscreen extent -1.24,-0.97 -0.99,-0.72, body extent -1.25,-0.55 1.25,0.55, height 0.25
FP-MCT0603-IPC_B [mil]
  rect 34x37.88 smd paste+0 mask+0: 1(-28.72,0) 2(28.72,0)
  body extent -56,-29 56,29, height 10
FP-OS-CON-SMT-C6-MFG [mm]
  rect 3.5x1.6 smd paste+0 mask+0: 1(-2.8,0) 2(2.8,0)
  silkscreen extent -5.22,-3.4 3.4,3.4, body extent -4.8,-3.65 4.8,3.65, height 0.25
FP-PA2512E-R007-0R10-MFG [mm]
  rect 1.65x3.68 smd paste+0 mask+0: 1(-2.855,0) 2(2.855,0)
  silkscreen extent -1.66,-1.72 1.66,1.72, body extent -3.78,-1.94 3.78,1.94, height 0.25
FP-RC0603-0_55-IPC_C [mil]
  rect 25.93x31.97 smd paste+0 mask+0: 1(-26.64,0) 2(26.64,0)
  body extent -44,-22 44,22, height 10
FP-RT0603-MFG [mm]
  rect 0.9x0.8 smd paste+0 mask+0: 1(-0.85,0) 2(0.85,0)
  body extent -1.4,-0.55 1.4,0.55, height 0.25
FP-SOT23-MFG [mm]
  rect 0.9x0.8 smd paste+0 mask+0: 1(-1,0.95) 2(-1,-0.95) 3(1,0)
  silkscreen extent -0.18,-1.5 0.7,1.5, body extent -1.55,-1.6 1.55,1.6, height 0.25
FUSC3215X76N [mm]
  rect 1.2x1.67 smd: 1(-1.415,0) 2(1.415,0)
  silkscreen extent 0,-0.66 0,0.66, body extent -1.59,-0.76 1.59,0.76, height 0.76
KSTN-5003 [mm] "Test Point, Through Hole, Dia 2.54mm"
  round 1.5 hole 1: 1(0,0)
  silkscreen extent -1.27,-1.27 1.27,1.27, body extent -1.27,-1.27 1.27,1.27, height 4.57
KTT0003B [mm]
  rect 2.16x1.07 smd: 1(12.67,-2.54) 2(12.67,0) 3(12.67,2.54)
  rect 7x8.33 smd: 4(2,0)
  rect 1.91x1.235 smd: 5(-0.545,4.782) 6(-0.545,-4.782)
  silkscreen extent 0.94,-5.08 14.56,5.08, body extent -1.52,-5.08 13.72,5.08, height 4.54
NS0020A_L [mm] "SOIC,20-Leads,Body 12.9x5.6mm,Pitch 1.27mm,IPC High Density"
  rrect17% 1.45x0.6 smd: 1(-3.525,5.715) 2(-3.525,4.445) 3(-3.525,3.175) 4(-3.525,1.905) 5(-3.525,0.635) 6(-3.525,-0.635) 7(-3.525,-1.905) 8(-3.525,-3.175) 9(-3.525,-4.445) 10(-3.525,-5.715) 11(3.525,-5.715) 12(3.525,-4.445) 13(3.525,-3.175) 14(3.525,-1.905) 15(3.525,-0.635) 16(3.525,0.635) 17(3.525,1.905) 18(3.525,3.175) 19(3.525,4.445) 20(3.525,5.715)
  silkscreen extent -3.65,-6.45 2.4,6.69, body extent -2.8,-6.45 2.8,6.45, height 2
PWP0020A_M [mm] "SOP, 20-Leads, Body 6.6x4.5mm, Pitch 0.65mm, Thermal Pad 4.2x3mm, IPC Low Density"
  rrect22% 1.6x0.45 smd: 1(-3.05,2.925) 2(-3.05,2.275) 3(-3.05,1.625) 4(-3.05,0.975) 5(-3.05,0.325) 6(-3.05,-0.325) 7(-3.05,-0.975) 8(-3.05,-1.625) 9(-3.05,-2.275) 10(-3.05,-2.925) 11(3.05,-2.925) 12(3.05,-2.275) 13(3.05,-1.625) 14(3.05,-0.975) 15(3.05,-0.325) 16(3.05,0.325) 17(3.05,0.975) 18(3.05,1.625) 19(3.05,2.275) 20(3.05,2.925)
  rrect3% 3x4.2 smd: 21(0,0)
  silkscreen extent -3.17,-3.3 1.85,3.82, body extent -3.21,-3.25 3.21,3.25, height 1
RESC1608X55N [mm]
  rect 0.9x1 smd: 1(-0.75,0) 2(0.75,0)
  body extent -0.77,-0.4 0.78,0.4, height 0.45
RESC1608X55X25LL10T15 [mm] "Chip Resistor, 2-Leads, Body 1.70x0.90mm, IPC High Density"
  rect 0.6x0.8 smd: 1(-0.65,0) 2(0.65,0)
  body extent -0.85,-0.45 0.85,0.45, height 0.55
RESC1608X55X25ML10T15 [mm] "Chip Resistor, 2-Leads, Body 1.70x0.90mm, IPC Low Density"
  rect 0.8x1 smd: 1(-0.75,0) 2(0.75,0)
  body extent -0.85,-0.45 0.85,0.45, height 0.55
RESC1608X55X30LL15T15#1 [mm] "Chip Resistor, 2-Leads, Body 1.60x0.80mm, IPC High Density"
  rect 0.7x0.85 smd: 1(-0.625,0) 2(0.625,0)
  body extent -0.87,-0.48 0.87,0.48, height 0.55
RESC1608X55X30LL15T15#2 [mm] "Chip Resistor, 2-Leads, Body 1.75x0.95mm, IPC High Density"
  rect 0.75x0.85 smd: 1(-0.65,0) 2(0.65,0)
  body extent -0.87,-0.48 0.87,0.48, height 0.55
RESC1608X55X30ML15T15 [mm] "Chip Resistor, 2-Leads, Body 1.60x0.80mm, IPC Low Density"
  rect 0.9x1.05 smd: 1(-0.725,0) 2(0.725,0)
  body extent -0.87,-0.48 0.87,0.48, height 0.55
RESC1608X55X30NL15T15 [mm] "Chip Resistor, 2-Leads, Body 1.60x0.80mm, IPC Medium Density"
  rect 0.8x0.95 smd: 1(-0.675,0) 2(0.675,0)
  body extent -0.87,-0.48 0.87,0.48, height 0.55
RP2040TR7 [mm]
  rect 0.875x0.2 smd: 1(-3.438,2.6) 2(-3.438,2.2) 3(-3.438,1.8) 4(-3.438,1.4) 5(-3.438,1) 6(-3.438,0.6) 7(-3.438,0.2) 8(-3.438,-0.2) 9(-3.438,-0.6) 10(-3.438,-1) 11(-3.438,-1.4) 12(-3.438,-1.8) 13(-3.438,-2.2) 14(-3.438,-2.6) 29(3.438,-2.6) 30(3.438,-2.2) 31(3.438,-1.8) 32(3.438,-1.4) 33(3.438,-1) 34(3.438,-0.6) 35(3.438,-0.2) 36(3.438,0.2) 37(3.438,0.6) 38(3.438,1) 39(3.438,1.4) 40(3.438,1.8) 41(3.438,2.2) 42(3.438,2.6)
  rect 0.2x0.875 smd: 15(-2.6,-3.438) 16(-2.2,-3.438) 17(-1.8,-3.438) 18(-1.4,-3.438) 19(-1,-3.438) 20(-0.6,-3.438) 21(-0.2,-3.438) 22(0.2,-3.438) 23(0.6,-3.438) 24(1,-3.438) 25(1.4,-3.438) 26(1.8,-3.438) 27(2.2,-3.438) 28(2.6,-3.438) 43(2.6,3.438) 44(2.2,3.438) 45(1.8,3.438) 46(1.4,3.438) 47(1,3.438) 48(0.6,3.438) 49(0.2,3.438) 50(-0.2,3.438) 51(-0.6,3.438) 52(-1,3.438) 53(-1.4,3.438) 54(-1.8,3.438) 55(-2.2,3.438) 56(-2.6,3.438)
  rect 3.2x3.2 smd: 57(0,0)
  silkscreen extent -4.5,-3.5 3.5,3.5, body extent -3.86,-3.86 3.86,3.86, height 1
SHDR2W70P0X500_1X2_1000X750X1150P [mm]
  rect 1.8x1.8 hole 1.2: 1(0,0)
  round 1.8 hole 1.2: 2(5,0)
  silkscreen extent -2.5,-3.5 7.6,4.1, body extent -2.46,-3.44 7.54,4.06, height 11.5
SOIC127P600X175-8N [mm]
  rect 1.525x0.65 smd: 1(-2.712,1.905) 2(-2.712,0.635) 3(-2.712,-0.635) 4(-2.712,-1.905) 5(2.712,-1.905) 6(2.712,-0.635) 7(2.712,0.635) 8(2.712,1.905)
  silkscreen extent -3.47,-2.45 1.6,2.58, body extent -3,-2.45 3,2.45, height 1.75
SOIC127P790X216-8N [mm]
  rect 1.65x0.65 smd: 1(-3.6,1.905) 2(-3.6,0.635) 3(-3.6,-0.635) 4(-3.6,-1.905) 5(3.6,-1.905) 6(3.6,-0.635) 7(3.6,0.635) 8(3.6,1.905)
  silkscreen extent -4.43,-2.64 2.42,2.64, body extent -3.95,-2.64 3.95,2.64, height 2.16
TLV76136DCYR-Footprint-1 [mm]
  rect 2x1.5 smd paste+0 mask+0: 1(-3.15,2.3) 2(-3.15,0) 3(-3.15,-2.3)
  rect 2x3.8 smd paste+0 mask+0: 4(3.15,0)
  silkscreen extent -3.27,-3.35 1.85,3.75, body extent -4.25,-3.45 4.25,3.45, height 0.25
VP0265540000G [mm]
  rect 2.55x2.55 hole 1.7: 1(0,0)
  round 2.55 hole 1.7: 2(0,10.16) 3(10.16,0) 4(10.16,10.16)
  silkscreen extent -5.7,-6.54 15.84,11.76, body extent -5.08,-6.54 15.84,11.76, height 28.9
WE-XHMA_1090 [mm] "SMT Power Inductor, 2-Leads, body 11.6x10.5mm"
  rect 9x2.5 smd: 1(-1270,-1266.8) 2(-1270,-1273.2)
  Top Layer keep-out region: -1275.8,-1268.25 -1264.2,-1268.25 -1264.2,-1271.75 -1275.8,-1271.75
  silkscreen extent -1276.57,-1275.4 -1264.05,-1264.6, body extent -1275.8,-1275.25 -1264.2,-1264.75, height 8.8

## Part data
+3.3V +5V +12V +24V: library part CMP-002-00037-2, "Test Point, Orange, Height 4.6 mm, Tail Length 3 mm, 1-Pin THD, RoHS", Colour=Orange, Manufacturer=Keystone, Package Description="1-Pin Through Hole Device, Dia 2.54 mm", Package Quantity=10, Case/Package=5003, Connector Type=TestPoint, Contact Material=Bronze, Contact Plating=Tin, Datasheet URL=http://keyelco.com/userAssets/file/M65p56.pdf, Datasheet Version=Jun-15, Diameter=2.54mm, Manufacturer URL=http://www.keyelco.com/, Mounting Technology=TH, Package Reference=5003, Packaging=Bulk, Pins=1, RoHS Compliant=True
+5V PICO: library part CMP-04767-000028-2, "CONN RCP USB2.0 TYP C 24P SMD RA", Current Rating=1.25A, Max Operating Temperature=85°C, Min Operating Temperature=-40°C, Voltage Rating=30V, Contact Material="Gold, Nickel", Gender=Receptacle, Height=3.36mm, NexarPartId=117190526, Number of Contacts=16, USB Standard="USB 2.0"
+48-60V: "Connector", Manufacturer_Name=Amphenol, Mouser Part Number=649-VP02655400J0G, Arrow Part Number=VP0265540000G, Arrow Price/Stock=null?region=nac, Datasheet Link=http://www.anytek.com.tw/Upload/8VP0003-09242723142.pdf, Height=28.8mm, Manufacturer_Part_Number=VP0265540000G, Mouser Price/Stock=https://www.mouser.co.uk/ProductDetail/Amphenol-Anytek/VP0265540000G?qs=Mv7BduZupUhE8TXEOgWbFQ%3D%3D
Analog BR_PWR MCont ST_PWR: "Connector", Manufacturer_Name="Wurth Elektronik", Mouser Part Number=710-691137710002, Datasheet Link=https://www.we-online.com/components/products/download/691137710002+%28rev1%29.pdf, Height=11.5mm, Manufacturer_Part_Number=691137710002, Mouser Price/Stock=https://www.mouser.co.uk/ProductDetail/Wurth-Elektronik/691137710002?qs=lBTPRtX1sU9LnHBbviNKGA%3D%3D
BOOTSEL1 SW1: library part CMP-2100-03586-2, "SWITCH TACTILE SPST-NO 0.05A 12V", Contact Current Rating=50mA, Contact Resistance=100mR, Insulation Resistance=100MR, Max Operating Temperature=70°C, Max Voltage Rating (DC)=12V, Min Operating Temperature=-25°C, Operating Force=1.5N, Package Quantity=1, Ratings="Dust Proof", Actuator Length=0.4mm, Actuator Type=Standard, Contact Material=Silver, Current Rating=50mA, Depth=2.5mm, Electrical Life=200000Cycles, Height=1.2mm, Illumination Type=Non-Illuminated, Lead Free="Lead Free", Length=4mm, Max Current Rating=50mA, Mechanical Life=200000Cycles, Mount="Surface Mount", Orientation=Straight, Packaging="Tape and Reel", Switch Function=Off-Mom, Switch Travel=0.15mm, Termination=SMD/SMT, Throw Configuration=SPST, Voltage Rating (DC)=12V, Weight=0.000776oz, Width=3mm
BR_SENSE RPM_BL RPM_BR RPM_FL RPM_FR ST_SENSE: library part CMP-1502-03325-3, "Terminal Block, 5MM Pitch, Horizontal, Pressure Clamp Glow Wire, Pcb, 3PINS, Gr", Lead Pitch=5mm, Number of Pins=3, Packaging=Box, RoHS=Non-Compliant
BRAKE STEER: library part CMP-04776-000273-1, "CONN HEADER R/A 6POS 4.2MM", Contact Resistance=10mR, Current Rating=13A, Flammability Rating="UL94 V-0", Housing Color=Natural, Insulation Resistance=1GR, Manufacturer Series=5569, Max Operating Temperature=105°C, Max Voltage Rating (AC)=600V, Min Operating Temperature=-40°C, Contact Finish - Mating="TIN (200) OVER COPPER", Contact Finish - Termination="TIN (200) OVER COPPER", Contact Gender=Male, Contact Material=Brass, Contact Plating=Tin, Contact Type="Male Pin", Depth=19.4mm, DIN Conformance=No, ELV=Compliant, Empty Shell=No, Fastening Type=Ramp, Filter Feature=No, Gender=Male, Glow Wire Compliant=Non-compliant, Halogen Free="Low Halogen", Housing Material=Polyamide, IEC Conformance=No, Lead Free="Lead Free", Material=Nylon, Mating Information="MULTIPLE MATING PARTS AVAILABLE", MIL Conformance=No, Mixed Contacts=No, Mount="Through Hole", Number of Circuits=6, Number of Contacts=6, Number of Ports=1, Number of Positions=6, Number of Rows=2, Option="General Purpose", Orientation="Right Angle", Packaging=Bag, Pitch=4.2mm, Radiation Hardening=No, Row Spacing=0.165inch, Series="Mini-Fit® Jr™ 5569", Shell Material=POLYAMIDE66, Termination=Solder, Voltage Rating=600V, Voltage Rating (DC)=600V
C1 C2: library part CMP-00212-26722299-1, "ESH477M100AM2AA Radial Can ALUMINUM ELECTROLYTIC CAPACITOR ESH 100V 470muF ±20% 0.630Dia 16.00mm", Capacitance=470µF, Case/Package=Radial, Max Operating Temperature=105°C, Min Operating Temperature=-25°C, Tolerance=20%, Voltage Rating=100V, Diameter=16mm, Height=32mm, Lead Pitch=7.5mm, Life (Hours)=2000hours, NexarPartId=26722299, Packaging="Tape & Reel", REACH SVHC="No SVHC", RoHS=Compliant, Voltage Rating (DC)=100V
C3 C5 C50: library part CMP-06035-032378-1, "Multi-Layer Ceramic Capacitor 10uF 25V X5R ±20% 0603 Paper T/R", Capacitance=10uF, Case Code (Imperial)=0603, Case Code (Metric)=1608, Max Operating Temperature=85°C, Min Operating Temperature=-55°C, Ratings=AEC-Q200, Tolerance=20%, Voltage Rating=25V, Case/Package=0603, Length=0.063inch, Mount="Surface Mount", Packaging="Tape and Reel", Thickness=0.035inch, Width=0.031inch
C4 C10 C19 C31 C32 C49: library part CMP-2000-07531-4, "Ceramic Capacitor General Use 1uF ±10% 50V X7R 0603", Capacitance=1uF, Case Code (Imperial)=0603, Case Code (Metric)=1608, Dielectric=X7R, Max Operating Temperature=125°C, Min Operating Temperature=-55°C, Package Quantity=1, Tolerance=10%, Voltage Rating=50V, Case/Package=0603, Construction=Flat, Depth=0.8mm, Halogen Free="Halogen Free", Height=0.8mm, Length=1.6mm, Mount="Surface Mount", Packaging="Tape and Reel", Radiation Hardening=No, RoHS Compliant=Yes, Series=M, Termination=SMD/SMT, Thickness=0.037inch, Voltage Rating (DC)=50V, Width=0.031inch
C6 C8 C12 C17 C23 C26 C27 C29: library part CMP-001-00090-1, "Ceramic Capacitor, Multilayer, Ceramic, 100V, 10% +Tol, 10% -Tol, X7R, 15% TC, 0.1uF, Surface Mount, 0603", Capacitor Type=Ceramic, Case/Package=0603, Max Operating Temperature=125°C, Min Operating Temperature=-55°C, Mounting Technology="Surface Mount", Pins=2, RoHS Compliant=Yes
C7 C15: library part CMP-2006-03314-2, "CAP CER 27PF 50V C0G/NP0 0603", Capacitance="27 pF", Manufacturer=KEMET, Package=C0603C-CF, Temperature="-55°C to +125°C", Temperature Characteristic=C0G, Temperature Coefficient=30ppm/°C, Temperature Range High=+125°C, Temperature Range Low=-55°C, Tolerance=0.05, Voltage Rating="50 V", Automotive=Yes, Automotive Grade="Grade 1", Category=Cap, ComponentLink2Description=Datasheet, ComponentLink2URL=https://api.kemet.com/component-edge/download/datasheet/C0603C100J5GACAUTO.pdf, Device Class L1="Passive Components", Device Class L2=Capacitors, Device Class L3="Ceramic Capacitors", Digikey Description="CAP CER 27PF 50V C0G/NP0 0603", Height=0.87mm, Lead Free=Yes, Manufacturer Part Number=C0603C270J5GACTU, Material=Ceramic, Mouser Description="Multilayer Ceramic Capacitors MLCC - SMD/SMT 50volts 27pF C0G 5%", Octopart=https://octopart.com/c0603c270j5gactu-kemet-136059, RoHS=TRUE
C9 C13: library part CMP-03422-001047-1, "CC0603 1 uF X7R 10.00% 16 V", Capacitance="1 uF", Manufacturer=YAGEO, Package=CC0603-DA, Temperature="-55°C to +125°C", Temperature Characteristic=X7R, Temperature Coefficient=15%, Temperature Range High=+125°C, Temperature Range Low=-55°C, Tolerance=0.1, Voltage="16 V", Automotive=No, Category=Cap, ComponentLink2Description=Datasheet, ComponentLink2URL=http://www.yageo.com/documents/recent/UPY-GPHC_X7R_6.3V-to-50V_18.pdf, Device Class L1="Passive Components", Device Class L2=Capacitors, Device Class L3="Ceramic Capacitors", Footprint Url=http://www.yageo.com/exep/pages/download/literatures/UPY-C_GEN_24.pdf, Height=0.9mm, Lead Free=Yes, Manufacturer Part Number=CC0603KPX7R7BB105, Material=Ceramic, Mouser Description="Cap Ceramic 1uF 16V X7R 10% SMD 0603 125°C Paper T/R", Octopart=https://octopart.com/cc0603kpx7r7bb105-yageo-25629533, RoHS=TRUE, Voltage Rating="16 V"
C11 C14 C16 C18: library part CMP-06035-063309-1, "CAP CER 2.2UF 100V X7T 0805", Manufacturer="Murata Electronics", Manufacturer Part Number=GRM21BD72A225ME01K
C20: library part CMP-03020-034669-1, "CAP CER 1UF 100V X7R 1210", Capacitance=1uF, Case Code (Imperial)=1210, Case Code (Metric)=3225, Dielectric=X7R, Dielectric Material=Ceramic, Max Operating Temperature=125°C, Min Operating Temperature=-55°C, Package Quantity=1, Tolerance=10%, Voltage=100V, Case/Package=1210, Construction=Flat, Depth=2.5mm, Height=1.7mm, Length=3.2mm, Mount="Surface Mount", Number of Pins=2, Packaging="Tape and Reel", Radiation Hardening=No, REACH SVHC="No SVHC", RoHS Compliant=Yes, Series=C, Termination=SMD/SMT, Thickness=0.075inch, Voltage Rating=100V, Voltage Rating (DC)=100V, Width=0.098inch
C21: library part CMP-2100-03594-1, "Chip Capacitor, 100 pF, +/- 5%, 50 V, -55 to 125 degC, 0603 (1608 Metric), RoHS, Tape and Reel", Capacitance=100pF, Case Code (Imperial)=0603, Case Code (Metric)=1608, Dielectric=C0G, Insulation Resistance=100GR, Manufacturer=Yageo, Max Operating Temperature=125degC, Min Operating Temperature=-55degC, Package Description="2-Pin Surface Mount Device, Body 1.6 x 0.8 mm", Package Quantity=1, Temperature Coefficient=30ppm/degC, Tolerance=5%, Voltage=50V, Case/Package=0603, Composition=Ceramic, Datasheet URL=http://www.yageo.com/documents/recent/UPY-GP_NP0_16V-to-50V_14.pdf, Datasheet Version="Rev. 14, 07/2016", Depth=0.8mm, Height=0.8mm, Lead Free=LeadFree, Length=1.6mm, Manufacturer URL=http://www.yageo.com/, Mount=SurfaceMount, Number of Pins=2, Package Reference=0603, Packaging=TapeandReel, Radiation Hardening=No, REACH SVHC=Unknown, RoHSCompliant=True, Termination=SMD/SMT, Thickness=0.035inch, Voltage Rating=50V, Voltage Rating (DC)=50V, Width=0.8mm
C22: library part CMP-13271-004036-1, "Cap Ceramic 100nF 100V X7R ±10% Pad SMD 0603 +125°C T/R", Capacitance=100nF, Case Code (Imperial)=0603, Case Code (Metric)=1608, Max Operating Temperature=125°C, Min Operating Temperature=-55°C, Tolerance=10%, Voltage Rating=100V, Case/Package=0603, Length=0.063inch, Mount="Surface Mount", Packaging="Cut Tape", Thickness=0.035inch, Width=0.031inch
C24: library part CMP-2006-03174-2, "CAP CER 3300PF 50V 5% X7R 0603", Capacitance="3,300 pF", Manufacturer=KEMET, Package=C0603C-CF, Temperature="-55°C to +125°C", Temperature Characteristic=X7R, Temperature Coefficient=30ppm/°C, Temperature Range High=+125°C, Temperature Range Low=-55°C, Tolerance=0.05, Voltage Rating="50 V", Automotive=Yes, Automotive Grade="Grade 1", Category=Cap, ComponentLink2Description=Datasheet, ComponentLink2URL=https://api.kemet.com/component-edge/download/datasheet/C0603C100J5GACAUTO.pdf, Device Class L1="Passive Components", Device Class L2=Capacitors, Device Class L3="Ceramic Capacitors", Digikey Description="CAP CER 3300PF 50V 5% X7R 0603", Height=0.87mm, Lead Free=Yes, Manufacturer Part Number=C0603C332J5RACTU, Material=Ceramic, Mouser Description="Multilayer Ceramic Capacitors MLCC - SMD/SMT 50volts 3300pF X7R 5%", Octopart=https://octopart.com/c0603c332j5ractu-kemet-9139905, RoHS=TRUE
C25: library part CMP-2006-03022-3, "CAP CER 1000PF 50V X7R 0603", Capacitance="1,000 pF", Manufacturer=KEMET, Manufacturer Part Number=C0603C102K5RACTU, Package=C0603C-CF, Temperature="-55°C to +125°C", Temperature Characteristic=X7R, Temperature Coefficient=30ppm/°C, Temperature Range High=+125°C, Temperature Range Low=-55°C, Tolerance=0.1, Voltage Rating="50 V", Automotive=Yes, Automotive Grade="Grade 1", Category=Cap, ComponentLink2Description=Datasheet, ComponentLink2URL=https://api.kemet.com/component-edge/download/datasheet/C0603C100J5GACAUTO.pdf, Device Class L1="Passive Components", Device Class L2=Capacitors, Device Class L3="Ceramic Capacitors", Digikey Description="CAP CER 1000PF 50V X7R 0603", Height=0.87mm, Lead Free=Yes, Material=Ceramic, Mouser Description="Capacitor; Ceramic; Cap; 1000pF; Tol 10%; SMT; Vol-Rtg 50V; X7R; Tape and Reel", Octopart=https://octopart.com/c0603c102k5ractu-kemet-144878, RoHS=TRUE
C28: library part CMP-2000-07546-2, "Cap Ceramic 100nF 50V X7R 10% Pad SMD 0603 +125°C Automotive T/R", Capacitance=100nF, Case Code (Imperial)=0603, Case Code (Metric)=1608, Dielectric=X7R, Manufacturer="Samsung Electro-Mechanics", Max Operating Temperature=125°C, Min Operating Temperature=-55°C, Package Quantity=1, Ratings=AEC-Q200, Tolerance=10%, Voltage=50V, Case/Package=0603, Composition=Ceramic, Depth=0.8mm, Height=0.8mm, Lead Free="Lead Free", Length=1.6mm, Manufacturer Part Number=CL10B104KC8NNNC, Mount="Surface Mount", Packaging="Tape and Reel", Radiation Hardening=No, REACH SVHC="No SVHC", Termination=SMD/SMT, Thickness=0.035inch, Voltage Rating=50V, Voltage Rating (DC)=50V, Weight=7.1E-05oz, Width=0.8mm
C30 C33 C34 C39: library part CMP-03422-000397-1, "CC0603 22 nF X7R 20.00% 50 V", Capacitance="22 nF", Manufacturer=YAGEO, Manufacturer Part Number=CC0603MRX7R9BB223, Package=CC0603-DA, Temperature="-55°C to +125°C", Temperature Characteristic=X7R, Temperature Coefficient=15%, Temperature Range High=+125°C, Temperature Range Low=-55°C, Tolerance=0.2, Voltage="50 V", Automotive=No, Category=Cap, ComponentLink2Description=Datasheet, ComponentLink2URL=http://www.yageo.com/documents/recent/UPY-GPHC_X7R_6.3V-to-50V_18.pdf, Device Class L1="Passive Components", Device Class L2=Capacitors, Device Class L3="Ceramic Capacitors", Footprint Url=http://www.yageo.com/exep/pages/download/literatures/UPY-C_GEN_24.pdf, Height=0.9mm, Lead Free=Yes, Material=Ceramic, Mouser Description="Surface Mount Ceramic Multilayer Capacitor 0.022uF 20% X7R 50V 0603 Paper T/R", Octopart=https://octopart.com/cc0603mrx7r9bb223-yageo-88025763, RoHS=TRUE, Voltage Rating="50 V"
C35 C38 C40 C47 C48: library part CMP-13271-000016-1, "CAP CER 10UF 50V X5R 1206", Capacitance=10uF, Manufacturer="Wurth Elektronik", Package=CL31, Temperature="-55°C to +85°C", Temperature Characteristic=X5R, Temperature Coefficient=15%, Temperature Range High=+85°C, Temperature Range Low=-55°C, Tolerance=10%, Voltage=50V, Automotive=No, Category=Cap, ComponentLink2Description=Datasheet, ComponentLink2URL=http://www.samsungsem.com/kr/support/product-search/mlcc/__icsFiles/afieldfile/2018/06/21/CL31A106KBHNNNE.pdf, Device Class L1="Passive Components", Device Class L2=Capacitors, Device Class L3="Ceramic Capacitors", Digikey Description="CAP CER 10UF 50V X5R 1206", Height=1.8mm, Ipc Land Pattern Name=CAPC320160X160, Lead Free=Yes, Manufacturer Part Number=885012108022, Material=Ceramic, Octopart=https://octopart.com/cl31a106kbhnnne-samsung-19832778, RoHS=TRUE, Voltage Rating=50V
C36: library part CMP-05428-000804-1, "Conductive Polymer Aluminum Solid Capacitors (OS-CON) 10uF ±20% 50V", Capacitance=10uF, Case/Package=Radial, ESR (Equivalent Series Resistance)=40mR, Leakage Current=100uA, Manufacturer="Panasonic Electronic Components", Max Operating Temperature=105°C, Min Operating Temperature=-55°C, Package Quantity=1000, Ripple Current=2.5A, Tolerance=20%, Voltage=50V, Construction=Cylindrical, Diameter=6.3mm, Dissipation Factor=12%, Height=5.9mm, Height - Seated (Max)=0.236inch, Lead Free="Lead Free", Length=5.9mm, Life (Hours)=5000Hour, Manufacturer Part Number=50SVPK10M, Mount="Surface Mount", Number of Pins=6, Packaging="Tape and Reel", REACH SVHC="No SVHC", Ripple Current (AC)=2.5A, RoHS Compliant=Yes, Series="OS-CON, SVPF", Termination=SMD/SMT, Voltage Rating=50V, Voltage Rating (DC)=50V
C37 C41: library part CMP-06035-011430-1, "Chip Multilayer Ceramic Capacitors for General Purpose, 1206, 47uF, X5R, 15%, 20%, 16V", Dielectric=X5R, Manufacturer="Murata Electronics", Manufacturer Part Number=GRM31CR61C476ME44L, Tolerance=20%, Voltage Rating (DC)=16V, Capacitance=47uF, Length=3.2mm, Thickness=1.6mm, Width=1.6mm
C42: library part CMP-06035-062583-1, "CAP CER 4.7UF 50V X7R 1206", Case Code (Imperial)=1206, Case Code (Metric)=3216, Manufacturer=KEMET, Manufacturer Part Number=C1206C475K5RACTU, Max Operating Temperature=125°C, Min Operating Temperature=-55°C, Tolerance=20%, Voltage Rating=50V, Capacitance=4.7uF, Case/Package=1206, Features="Soft Termination", Mount="Surface Mount", Packaging="Cut Tape", RoHS Compliant=Yes
C43 C44: library part CMP-1035-02579-1, "CAP 100nF 10V ±5% 0603 (1608 Metric) Thickness 1mm SMD", Case-EIA=0603, Case-Metric=1608, Manufacturer="Samsung Electro-Mechanics", Manufacturer Part Number=CL10B104KC8NNNC, Rated Voltage="10 V", Tolerance=Â±5%, Max Thickness="1 mm", Technology=SMT
C45: library part CMP-2006-01352-1, Manufacturer=Vitramon, Part Number=VJ0603A221FXAAC
C46: library part CMP-03020-007032-1, "C0603 15,000 pF X7R 30ppm/°C 5.00% 50 V", Capacitance="15,000 pF", Manufacturer=KEMET, Manufacturer Part Number=C0603C153J5RACAUTO, Package=C0603C-CF, Temperature="-55°C to +125°C", Temperature Characteristic=X7R, Temperature Coefficient=30ppm/°C, Temperature Range High=+125°C, Temperature Range Low=-55°C, Tolerance=0.05, Voltage Rating="50 V", Automotive=Yes, Automotive Grade="Grade 1", Category=Cap, ComponentLink2Description=Datasheet, ComponentLink2URL=https://api.kemet.com/component-edge/download/datasheet/C0603C100J5GACAUTO.pdf, Device Class L1="Passive Components", Device Class L2=Capacitors, Device Class L3="Ceramic Capacitors", Height=0.87mm, Lead Free=Yes, Material=Ceramic, Octopart=https://octopart.com/c0603c153j5racauto-kemet-88369026, RoHS=TRUE
D1 D3: library part CMP-004-00032-1, "Schottky Diode, 30V, 0.2A, Sod-323F Rohs Compliant: Yes", Manufacturer Lifecycle Status=ACTIVE, Lifecycle Status=Production
D2: library part CMP-22017-000005-2, "LED GREEN CLEAR CHIP SMD", Case Code (Imperial)=0603, Case Code (Metric)=1608, Color=Green, Forward Current=30mA, Forward Voltage=2.1V, Lens Color=Colorless, Max Operating Temperature=85°C, Min Operating Temperature=-55°C, Package Quantity=1, Power Dissipation=100mW, Reverse Voltage=5V, Test Current=10mA, Voltage=2V, Case/Package=0603, Depth=0.8mm, Dominant Wavelength=569nm, Height=0.8mm, Illumination Color=Green, Lead Free="Lead Free", Length=1.6mm, Lens Style=Clear, Lens Transparency=Clear, Luminous Intensity=6mcd, Mount="Surface Mount", Number of Elements=1, Number of LEDs=1, Number of Pins=2, Packaging="Tape and Reel", Power Rating=100mW, Radiation Hardening=No, Viewing Angle=130°, Wavelength=565nm, Width=0.8mm
D4 D5: library part CMP-2000-05115-2, "Small Signal Diode, 100 V, 0.2 A, -55 to 175 degC, 2-Pin SOD80, RoHS, Tape and Reel", Average Forward Current-Max=200mA, Forward Voltage=1V, Manufacturer=Fairchild, Power Dissipation=500mW, Reverse Voltage-Max [Vrrm]=100V, Datasheet URL=https://www.fairchildsemi.com/datasheets/LL/LL4148.pdf, Datasheet Version="Rev. 1.8, 01/2016", Manufacturer URL=https://www.fairchildsemi.com/, Reverse Recovery Time-Max=1ns